# Altium PCB cm4gateway.PcbDoc (part 3 of 5)
Units mil, origin at the board's own origin, x right, y up, seen from the top; angles counter-clockwise.
Board outline 6299.21 x 4960.63 mil, 8 copper layers (Signal 1, Ground Plane 1, Signal 2, Power Plane 1, Power Plane 2, Signal 3, Ground Plane 2, Signal 4), stack 60.024 mil thick; 403 components, 273 nets, 1526 pads, 1156 vias.
Unrouted connection lines stored in the file: 5.
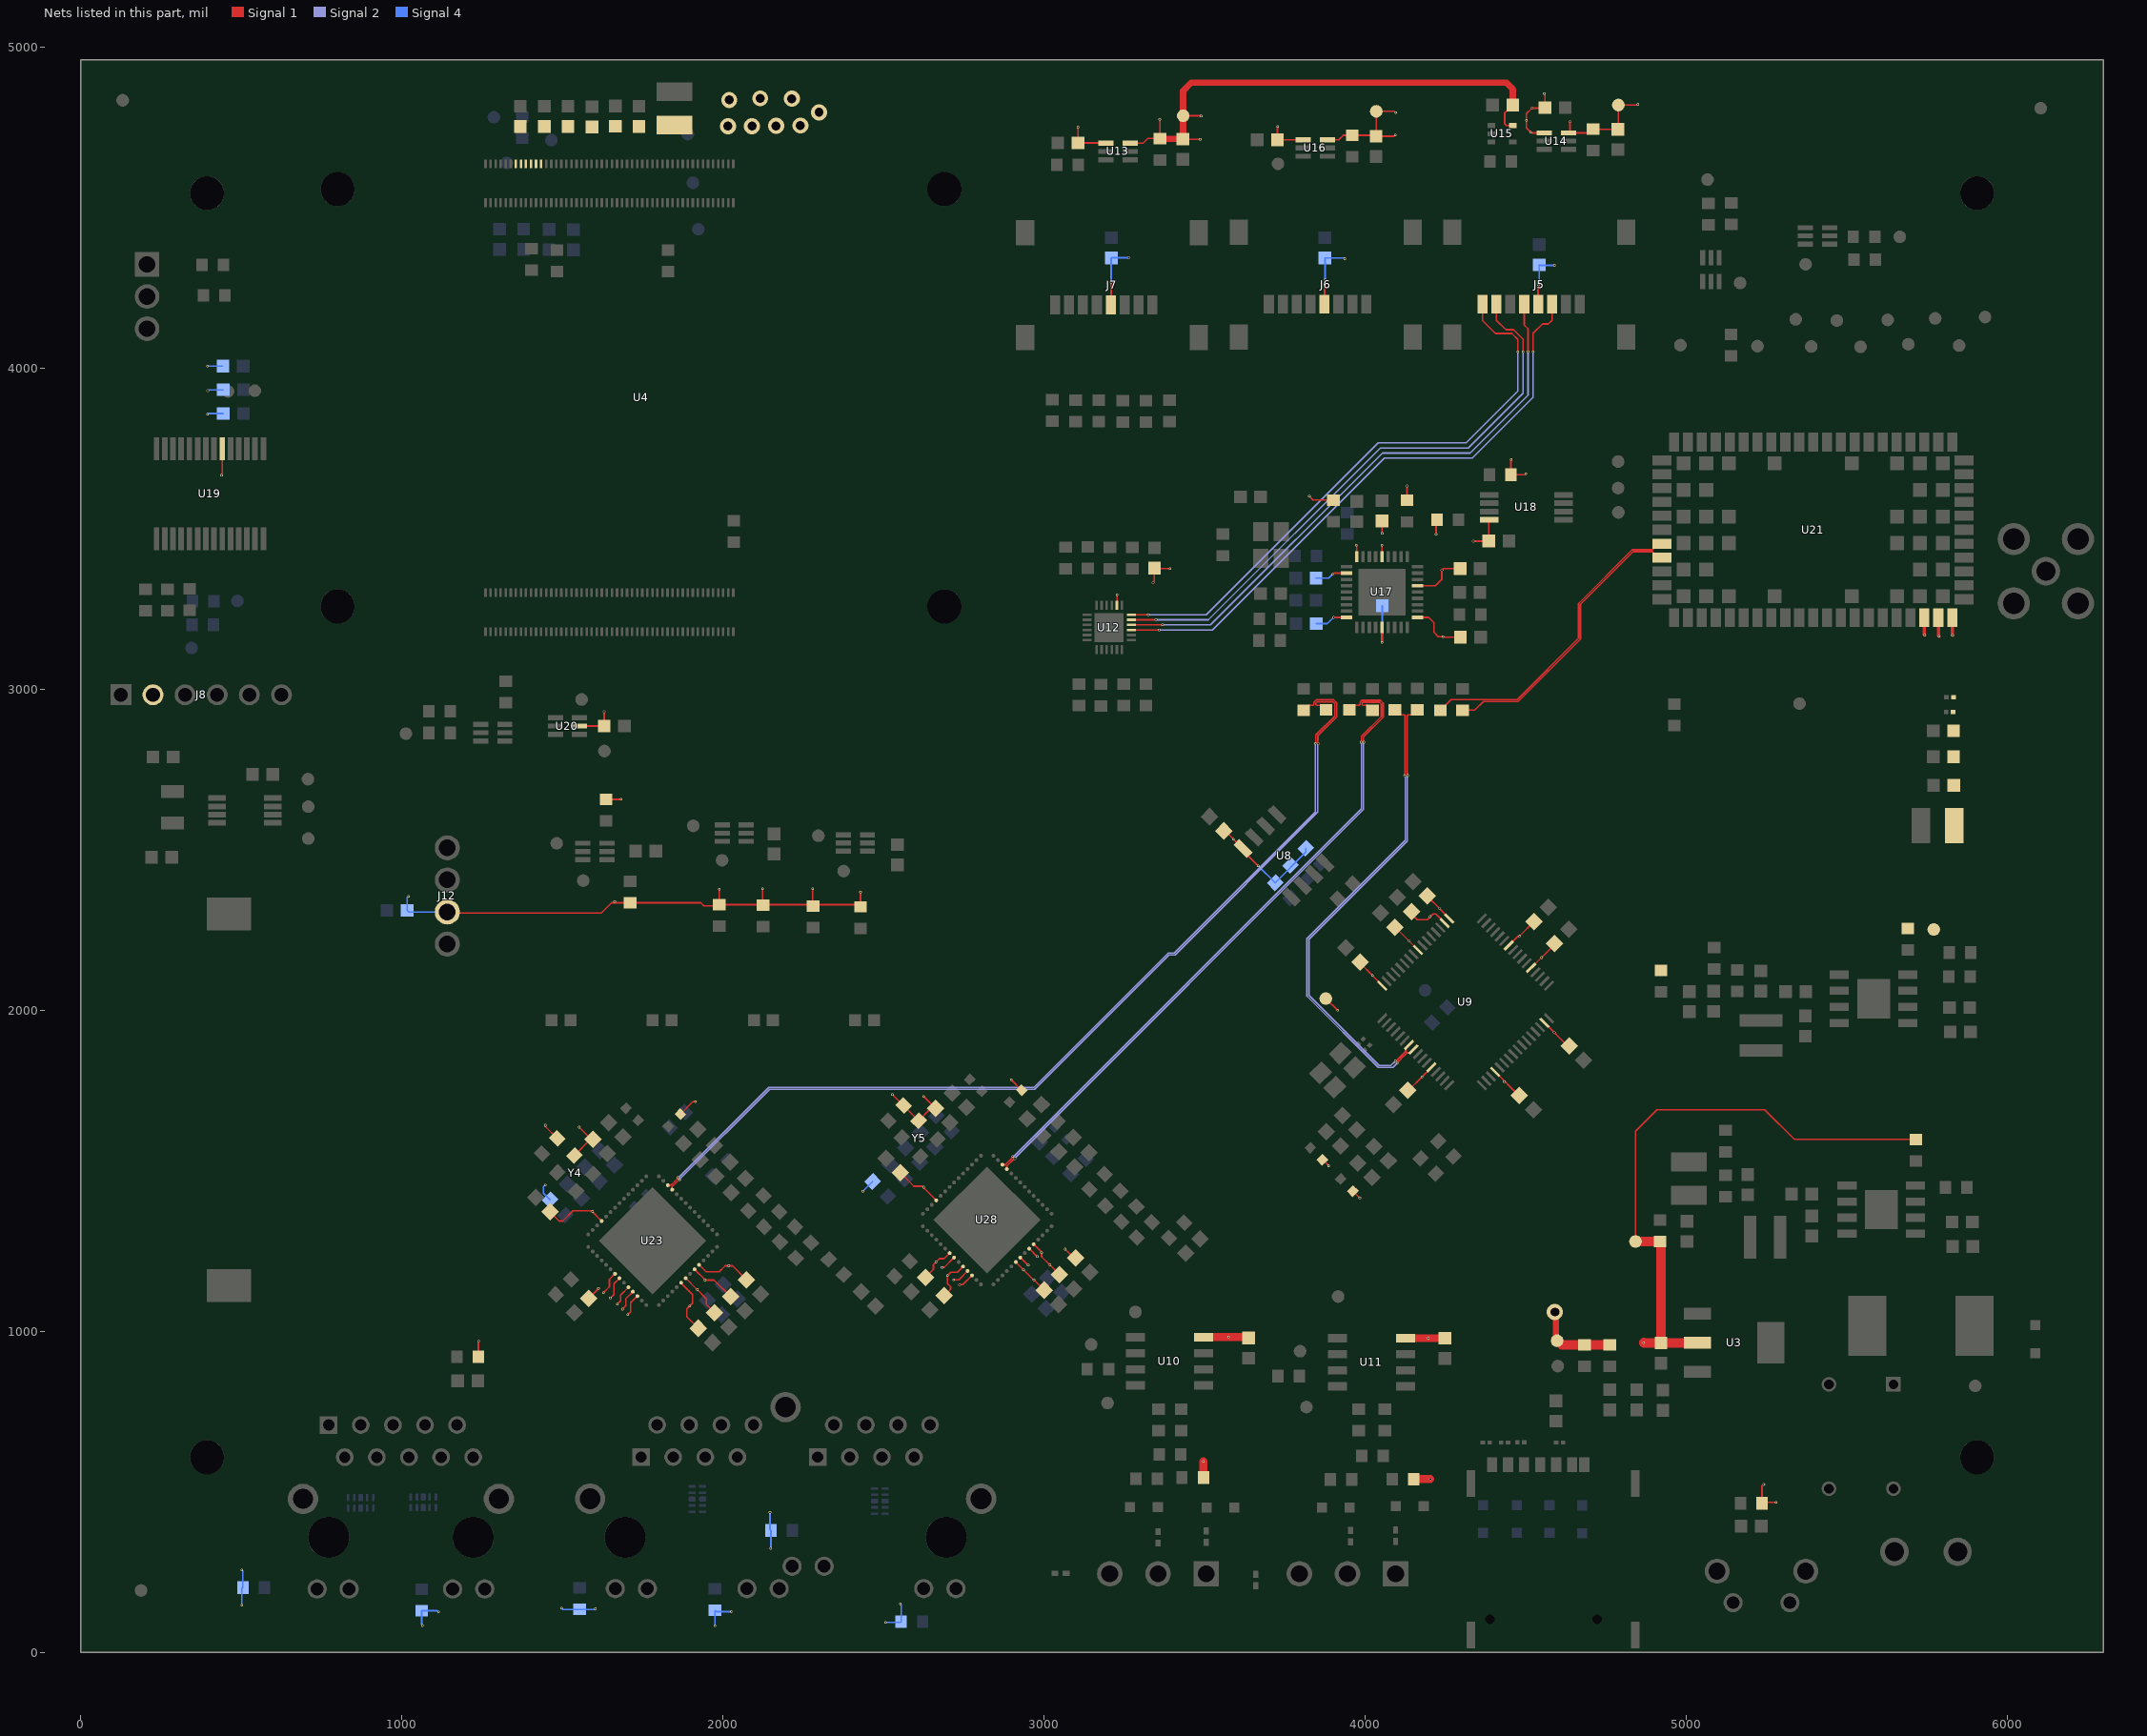
[diagram p8: the nets of this part, all layers, seen from the top]

## Via types
v1: diameter 8/8/8/8/8/8/8/8 (per signal layer), hole 5, Signal 1 to Signal 4, 822 vias
v2: diameter 8, hole 5, Signal 1 to Signal 4, tented both sides, 310 vias
v3: diameter 50, hole 28, Signal 1 to Signal 4, tented both sides, 10 vias
v4: diameter 8/8/8/8/8/8/8/8 (per signal layer), hole 5, Signal 1 to Signal 4, tented both sides, 9 vias
v5: diameter 8, hole 5, Signal 1 to Signal 4, 4 vias
v6: diameter 50, hole 5, Signal 1 to Signal 4, tented both sides, 1 vias

## Nets (pads, with @x,y where several pads share a name; then routed paths per layer and width w, separated by ;. In a path a pad name is that pad's centre, name@x,y a point inside that pad or via, vN(x,y) a via of type N, cw(c..) or ccw(c..) an arc to the next point about the centre after c; other vN are vias at no path point) (continued)
3v3: (continued)
  Signal 1 w5: v2(438.98,3666.34) 438.98,3667.15 440.94,3669.12 U19.20@440.94,3748.03 ; J12.2@1141.73,2305.71 1145.28,2302.17 1621.06,2302.17 1653.54,2334.65 v2@1665.08,2334.65 ; R127.2@1238.19,920.28 1238.19,966.71 1240.16,968.68 v2(1240.16,969.49) ; v2(1446.85,1641.73) 1447.42,1641.16 1447.42,1637.3 R118.2@1483.67,1601.05 ; C107.2@1461.98,1371.68 1490.16,1343.5 1500.98,1343.5 1532.48,1375 1590.56,1375 U23.25@1622.2,1343.36 ; Y4.4@1536.95,1547.44 1587.21,1597.69 1590.3,1597.69 v2(1552.16,1635.83) ; U20.5@1553.15,2884.84 C77.2@1629.91,2884.83 ; C108.2@1581.69,1101.63 1611.63,1131.57 1611.63,1133.28 v2(1612.2,1133.86) ; v2(1627.95,1120.08) 1646.65,1138.78 1646.65,1161.81 U23.35@1663.95,1179.11 ; C77.2@1629.91,2884.83 v2(1629.92,2929.13) ; R25.2@1635.83,2656.5 1681.27,2656.5 1682.26,2657.48 v2(1683.07,2657.48) ; v2(1649.61,1103.35) 1660.43,1114.17 1660.43,1147.75 U23.36@1677.87,1165.19 ; v2(1662.96,2338.02) 1662.96,2337.21 1665.08,2335.09 v2@1665.08,2334.65 ; v2(1671.26,1084.65) 1681.1,1094.49 1681.1,1112.74 U23.38@1705.71,1137.35 ; v2(1687.01,1068.9) 1697.83,1079.73 1697.83,1101.63 U23.39@1719.63,1123.43 ; v2(1703.64,1052.24) 1712.6,1061.21 1712.6,1088.56 U23.40@1733.55,1109.51 ; FB5.1@1867.58,1675.9 1906.25,1714.57 v2(1914.37,1714.57) ; U23.48@1869.96,1151.27 1869.96,1149.72 1905.51,1114.17 1905.51,1087.6 v2(1896.65,1078.74) 1887.79,1069.88 1887.79,1045.28 C109.2@1923.59,1009.48 ; U23.49@1883.88,1165.19 1884.35,1165.19 1919.7,1129.84 v2(1920.17,1129.84) 1948.82,1101.2 1948.82,1083.66 C110.2@1974.16,1058.32 ; U23.51@1911.72,1193.03 1943.32,1161.43 1943.32,1160.02 v2(1943.9,1159.45) 1972.44,1159.45 C111.2@2023.74,1108.15 ; U23.52@1925.64,1206.95 1947.55,1185.04 1988.19,1185.04 2006.89,1203.74 2029.53,1203.74 C112.2@2073.2,1160.07 ; v2(1988.19,2376.97) R96.1@1988.19,2328.74 ; v2(2123.03,2377.95) 2123.03,2330.71 R98.1@2125,2328.74 ; v2(2279.53,2377.95) R99.1@2279.53,2328.74 ; R99.1@2280.51,2323.82 2279.53,2324.81 R99.1@2279.53,2328.74 ; v2(2428.15,2368.11) R100.1@2428.15,2321.85 2421.26,2328.74 R99.1@2279.53,2328.74 ; v2(2527.56,1737.21) 2561.97,1702.8 R129.2@2563.03,1702.8 2563.03,1702.46 Y5.4@2609.42,1656.07 2647.25,1693.9 C116.2@2662.4,1693.9 v2(2625,1731.3) ; C127.2@2552.78,1493.48 2594.49,1451.77 2620.08,1451.77 U28.25@2664.15,1407.7 ; C128.2@2630.54,1167.94 2655.51,1192.92 2655.51,1207.68 2674.21,1226.38 2688.83,1226.38 U28.35@2705.91,1243.45 ; v2(2682.09,1198.82) 2682.66,1199.39 2689.69,1199.39 U28.36@2719.83,1229.53 ; C132.2@2688.98,1111.22 2708.66,1130.91 2708.66,1138.78 2698.82,1148.62 v2(2698.82,1173.23) 2709.65,1184.06 2730.03,1184.06 U28.38@2747.67,1201.7 ; v2(2718.5,1160.43) 2734.25,1160.43 U28.39@2761.59,1187.78 ; v2(2737.2,1144.69) 2737.78,1145.26 2746.91,1145.26 U28.40@2775.51,1173.86 ; v2(2897.64,1783.47) 2930.03,1751.07 FB8.1@2930.2,1751.07 ; U28.48@2911.92,1215.61 2911.92,1215.33 v2@2936.02,1191.23 ; U28.49@2925.84,1229.53 2926.4,1229.53 2950.07,1205.87 v2(2950.79,1205.87) ; v2(2935.86,1191.6) v2@2968.07,1159.4 ; U28.51@2953.68,1257.37 2954.05,1257.37 2978.23,1233.19 v2(2978.61,1233.19) ; U28.52@2967.6,1271.29 2991.55,1247.34 2991.55,1245.65 v2(2992.13,1245.08) 2992.13,1232.28 v2(3017.72,1206.69) C130.2@3047.61,1176.8 ; v2(2968.22,1160.41) 3000.43,1128.2 C129.2@3000.73,1128.2 ; v2(3065.94,1255.91) 3093.87,1227.98 C131.2@3098.79,1227.98 ; v2(3105.31,4750) C54.1@3105.31,4700.79 3191.93,4700.79 U13.1@3192.91,4699.8 ; U12.14@3226.38,3260.93 3226.92,3261.47 3226.92,3292.84 v2(3227.46,3293.39) ; v2(3339.57,3331.69) 3339.57,3332.51 3343.5,3336.44 C51.1@3343.5,3376.97 3345.47,3375 v2(3391.73,3375) ; C33.2@3559.93,2558.45 3563.83,2558.45 U8.8@3619.22,2503.06 3619.22,2496.93 v2(3666.34,2449.8) ; v2(3727.36,4751.97) 3727.36,4751.16 3726.38,4750.17 C60.1@3726.38,4710.63 U16.1@3807.09,4710.63 ; v2(3825.79,3600.39) 3837.6,3588.58 R83.1@3900.59,3588.58 ; FB2.1@3866.59,1534.05 3867.53,1534.05 v2(3885.83,1515.75) ; v2(3897.64,3357.28) 3898.45,3357.28 3902.39,3361.22 U17.29@3941.93,3361.22 ; v2(3901.57,3223.43) U17.36@3941.93,3223.43 ; FB1.1@3961.17,1436.73 3961.9,1436.73 v2(3983.27,1415.35) ; v2(3972.42,3448.12) 3972.42,3447.31 3973.42,3446.3 U17.27@3973.42,3412.4 ; v2(4052.16,3145.67) U17.5@4052.16,3191.93 ; U17.23@4052.18,3412.42 v2(4052.2,3447.81) ; C65.2@4052.16,3523.62 4052.16,3487.21 4053.25,3486.13 v2(4053.25,3485.32) ; C50.2@4091.9,2257.51 4094.41,2257.51 U9.56@4164.13,2187.79 ; R70.2@4129.92,3587.6 v2(4129.92,3632.87) ; C38.2@4143.7,2307.09 4143.7,2300.2 4162.4,2281.5 4192.91,2281.5 4210.63,2299.21 4219.74,2299.21 U9.50@4247.65,2271.3 ; U17.10@4162.4,3223.43 4196.85,3223.43 4213.58,3206.69 4213.58,3177.17 4227.36,3163.39 v2(4242.13,3163.39) 4242.94,3163.39 4244.91,3161.42 C63.2@4296.26,3161.42 ; U17.15@4162.4,3321.85 4218.5,3321.85 4238.19,3341.54 v2(4238.19,3370.08) 4239,3370.08 4243.92,3375 C64.2@4295.27,3375 ; v2(4220.47,3482.28) 4220.47,3524.61 R89.1@4223.42,3527.56 ; v2(4336.61,3460.63) 4383.86,3460.63 C73.2@4384.84,3461.61 4384.84,3526.1 U18.8@4386.3,3527.56 ; U9.20@4404.94,1807.79 4478.22,1734.5 C48.2@4480.06,1734.5 ; U9.42@4446.7,2201.71 4474.73,2229.74 4479.74,2229.74 v2(4480.31,2230.32) ; v2(4454.72,3714.57) 4454.72,3713.76 4453.74,3712.77 R90.1@4453.74,3667.32 4496.65,3667.32 4499.51,3670.18 v2(4500.32,3670.18) ; v2@4480.19,2230.44 C49.2@4525.34,2275.59 ; v2@4515.96,4735.02 v2@4518.7,4732.28 ; v2(4557.64,4854.46) 4557.64,4853.65 4560.04,4851.25 C57.1@4560.04,4811.02 4558.34,4809.33 v2(4518.86,4809.33) 4502.12,4792.59 v2(4502.12,4771.77) 4502.12,4747.58 v2(4515.32,4734.38) 4516.13,4734.38 4518.23,4732.28 U14.1@4558.07,4732.28 ; U9.31@4558.05,1960.9 4629.92,1889.03 C47.2@4635.58,1889.03 ; v2(5241.14,522.64) 5240.64,522.64 5235.24,517.24 R97.2@5235.24,464.57 5238.19,467.52 v2(5279.53,467.52) ; v2@1665.08,2334.65 1931.1,2334.65 1940.94,2324.8 1984.25,2324.8 R96.1@1988.19,2328.74 ; R96.1@1988.19,2328.74 R98.1@2125,2328.74 ; R98.1@2125,2328.74 R99.1@2279.53,2328.74
  Signal 1 w20: v3(4590.55,1060.04) 4594,1056.6 4594,973.92 TP68.1@4597.44,970.47
  Signal 1 w30: TP68.1@4597.44,970.47 4599.98,970.47 4612.77,957.68 R18.1@4683.07,957.68 R17.2@4761.81,957.68
  Signal 4 w5: v2(394.68,3856.3) 395.5,3856.3 397.46,3858.27 C74.2@443.9,3858.27 ; v2(394.68,4005.91) C76.2@442.91,4005.91 ; v2(395.67,3929.13) 396.48,3929.13 399.43,3932.09 C75.2@443.9,3932.09 ; v2(501.97,146.65) 501.97,198.82 R131.2@504.92,201.77 504.92,253.13 501.97,256.08 v2(501.97,256.89) ; v2(1020.67,2354.33) 1020.67,2353.52 1016.73,2349.58 C93.2@1016.73,2311.02 1022.05,2305.71 J12.2@1141.73,2305.71 ; v2(1063.98,83.66) 1063.98,84.47 1062.01,86.44 R130.2@1062.01,129.92 1109.42,129.92 1113.36,125.98 v2(1114.17,125.98) ; v2(1446.48,1455.71) 1440.94,1450.18 1440.94,1430.12 R112.2@1461.94,1409.12 ; v2(1497.05,137.8) 1497.86,137.8 1501.8,133.86 R113.2@1554.13,133.86 1599.58,133.86 1601.55,135.83 v2(1602.36,135.83) ; v2(1975.39,82.68) R114.2@1975.39,130.91 1979.33,126.97 v2(2026.57,126.97) ; v2(2146.65,436.02) 2146.65,382.88 R115.2@2149.61,379.92 2149.61,325.62 2148.62,324.63 v2(2148.62,323.82) ; v2(2436.02,1436.02) 2466.49,1466.5 R126.2@2466.49,1466.58 ; v2(2505.9,93.5) 2553.15,93.5 R116.2@2555.12,95.47 2555.12,147.81 2552.16,150.76 v2(2552.16,151.58) ; v2(3666.34,2449.8) 3719.44,2396.7 R32.2@3719.7,2396.7 3815.18,2492.17 R34.2@3815.18,2503.99 ; C66.2@3846.46,3345.47 3885.83,3345.47 v2(3897.64,3357.28) ; C67.2@3847.44,3203.74 3881.89,3203.74 v2(3901.57,3223.43) ; v2(4052.16,3145.67) 4052.16,3146.48 4053.15,3147.47 C62.2@4053.15,3259.84
  other v2: 2017.72,1203.74 2663.39,1215.55 1593.5,1373.03 2625,1448.82 4433.07,1777.56 4588.58,1931.1 4135.83,2215.55 4201.77,2291.34 3589.57,2532.48
3V3_SDA: C52.2 C58.1 J5.4 R67.1 TP27.1 U14.6 | length 505.4
  Signal 1 w5: J5.4@4538.39,4198.82 4538.39,4258.05 4539.37,4259.03 v2(4539.37,4259.84) ; v2(4637.79,4767.72) 4637.79,4737.2 U14.6@4632.87,4732.28 4699.81,4732.28 4710.63,4743.11 C58.1@4786.42,4743.11 4788.39,4745.08 TP27.1@4788.39,4818.9 4846.63,4818.9 4848.6,4820.87 v2(4849.41,4820.87)
  Signal 4 w5: v2(4539.37,4259.84) 4539.37,4260.65 4542.1,4263.39 C52.2@4542.1,4320.87 4543.08,4319.88 v2(4589.57,4319.88)
3V3_SDB: C53.2 C61.1 J6.4 R69.1 TP29.1 U16.6 | length 568.9
  Signal 1 w5: J6.4@3873.23,4198.82 3873.23,4271.8 3874.91,4273.49 v2(3874.91,4274.3) ; U16.6@3881.89,4710.63 3917.32,4710.63 3931.1,4724.41 R69.1@3959.64,4724.41 4030.51,4724.41 C61.1@4033.46,4721.46 ; v2(4093.52,4725.16) 4092.71,4725.16 4089,4721.46 C61.1@4033.46,4721.46 ; v2(4094.91,4795.43) 4094.1,4795.43 4090.31,4799.21 TP29.1@4034.45,4799.21 4034.45,4722.44 C61.1@4033.46,4721.46
  Signal 4 w5: v2(3874.91,4274.3) 3874.91,4341.62 C53.2@3874.02,4342.52 3933.83,4342.52 3936.11,4340.24 v2(3936.92,4340.24)
3V3_SDD: C55.1 C56.2 C59.1 J7.4 R59.1 TP26.1 U13.6 U15.5 | length 1893.7
  Signal 1 w5: J7.4@3207.68,4196.85 3208.53,4197.7 v2(3208.53,4267.35) ; U13.6@3267.72,4699.8 3308.07,4699.8 3322.83,4714.57 R59.1@3361.22,4714.57 3361.22,4772.31 3360.1,4773.43 v2(3360.1,4774.24) ; C55.1@3433.07,4713.58 C55.1@3432.09,4712.6 3432.73,4711.95 v2(3486.26,4711.95) ; TP26.1@3433.07,4785.43 3488.67,4785.43 v2(3489.04,4785.07) ; U15.5@4459.65,4754.92 4439.96,4754.92 4434.05,4760.83 4434.05,4793.31 C59.1@4459.65,4818.9
  Signal 1 w20: R59.1@3353.35,4714.57 3354.33,4713.58 3431.1,4713.58 C55.1@3432.09,4712.6 ; C55.1@3433.07,4713.58 3432.58,4714.08 3432.58,4784.94 TP26.1@3433.07,4785.43 3433.07,4863.19 3458.66,4888.78 4438.98,4888.78 4459.65,4868.11 C59.1@4459.65,4818.9
  Signal 4 w5: v2(3208.53,4267.35) 3208.53,4341.4 C56.2@3209.65,4342.52 3210.27,4343.14 v2(3263.64,4343.14)
3v8: C79.2 C80.1 C81.2 C82.2 C83.2 C84.2 R2.2 R8.1 TP65.1 U21.51 U21.52 U21.53 | length 163.6
  Signal 1 w10: U21.51@5741.14,3222.44 5741.14,3169.29 v2(5742.13,3168.31) ; U21.52@5785.43,3218.51 5785.43,3165.35 v2(5786.42,3164.37) ; U21.53@5827.76,3221.46 5827.76,3168.31 v2(5828.74,3167.32)
5V: C15.2 C26.2 C27.2 C28.2 C29.2 C30.2 C31.2 C32.2 C40.2 C43.2 R10.2 R15.1 R36.2 R45.2 TP67.1 U3.2 U4.77 U4.79 U4.81 U4.83 U4.85 U4.87 U10.8 U11.8 | length 2210.2
  Signal 1 w5: TP67.1@4841.53,1279.53 4841.53,1623.03 4908.46,1689.96 5244.09,1689.96 5336.61,1597.44 R15.1@5714.57,1597.44
  Signal 1 w25: R36.2@3496.06,544.29 v2(3496.06,594.49) ; U10.8@3497.05,981.5 3574.01,981.5 v2(3574.8,982.28) 3633.86,982.28 C40.2@3636.81,979.33 ; U11.8@4125.98,978.54 4126.18,978.35 v2(4195.87,978.35) C43.2@4248.03,978.35 ; R45.2@4150.59,539.37 v2(4202.76,539.37)
  Signal 1 w30: TP67.1@4841.53,1279.53 R10.2@4918.31,1279.53 4918.54,1279.53 4921.26,1276.81 C15.2@4921.26,963.58 ; v2(4867.13,964.57) 4867.62,964.08 5033.96,964.08 U3.2@5034.45,964.57
  other v3: 2015.75,4752.95 2090.55,4752.95 2165.35,4753.94 2241.14,4754.92 2299.21,4796.26 2019.68,4834.65 2214.57,4838.58 2116.14,4839.57
_D1_N: R75.1 U23.11 | length 2994.9
  Signal 1 w5: U23.11@1842.12,1440.8 1841.76,1441.16 1841.76,1450.11 1852.11,1460.46 1862.99,1471.34 1865.11,1471.34 v2(1865.69,1471.91) ; R75.1@3808.07,2934.06 3823.29,2949.27 3836.88,2949.27 3839.81,2952.2 3839.81,2958.83 3847.24,2966.26 3901.76,2966.26 3911.14,2956.88 3911.14,2913.2 3852.46,2854.52 3852.46,2840.34 3852.15,2840.03 3852.15,2832.35 3854.23,2830.27 v2(3854.23,2830)
  Signal 2 w5: v2(1865.69,1471.91) 1866.26,1472.49 1866.26,1474.61 2145.59,1753.94 2971.08,1753.94 3389.51,2172.36 3407.99,2172.36 3852.28,2616.66 3852.28,2827.24 3854.23,2829.18 v2(3854.23,2830)
_D1_P: R74.1 U23.12 | length 2968.3
  Signal 1 w5: U23.12@1828.2,1454.71 1828.56,1454.36 1837.52,1454.36 1849.62,1466.46 1858.75,1475.58 1858.75,1477.7 v2(1859.32,1478.28) ; v2(3844.34,2830.34) 3844.34,2831.15 3846.15,2832.96 3846.15,2842.52 3846.46,2842.83 3846.46,2857 3905.14,2915.68 3905.14,2954.4 3899.28,2960.26 3849.72,2960.26 3845.81,2956.34 3845.81,2952.2 3848.74,2949.27 3863.72,2949.27 R74.1@3877.95,2935.04
  Signal 2 w5: v2(1859.32,1478.28) 1859.9,1478.85 1862.02,1478.85 2143.1,1759.94 2968.6,1759.94 3387.02,2178.36 3405.5,2178.36 3844.34,2617.2 v2(3844.34,2830.34)
_D2_N: R80.1 U28.11 | length 2064.2
  Signal 1 w5: U28.11@2884.08,1505.14 2883.72,1505.5 2883.72,1514.46 2906.42,1537.16 2908.54,1537.16 v2(2909.12,1537.73) ; R80.1@3950.79,2935.04 3965.02,2949.27 3980.99,2949.27 3983.92,2952.2 3983.92,2958.83 3990.36,2965.27 4046.45,2965.27 4055.82,2955.9 4055.82,2912.21 3994.7,2851.09 3994.7,2836.96 3996.2,2835.46 v2(3996.2,2834.65)
  Signal 2 w5: v2(2909.12,1537.73) 2909.69,1538.31 2909.69,1540.43 3994.7,2625.44 3994.7,2832.33 3996.2,2833.83 v2(3996.2,2834.65)
_D2_P: R78.1 U28.12 | length 2039.4
  Signal 1 w5: U28.12@2870.16,1519.06 2870.52,1518.7 2879.48,1518.7 2902.18,1541.4 2902.18,1543.52 v2(2902.75,1544.1) ; v2(3987.2,2834.65) 3987.2,2835.46 3988.7,2836.96 3988.7,2853.58 4049.82,2914.7 4049.82,2953.41 4043.97,2959.27 3992.84,2959.27 3989.92,2956.34 3989.92,2952.2 3992.84,2949.27 4007.42,2949.27 R78.1@4022.64,2934.06
  Signal 2 w5: v2(2902.75,1544.1) 2903.33,1544.67 2905.45,1544.67 3988.7,2627.92 3988.7,2832.33 3987.2,2833.83 v2(3987.2,2834.65)
_D3_N: R84.1 U9.8 | length 1560.3
  Signal 1 w4: v2(4099.79,1835.25) 4100.55,1836.02 4100.55,1838.85 4119.56,1857.85 4120.3,1857.85 4130.86,1868.42 4134.17,1868.42 4136.06,1866.53 4139.35,1866.53 U9.8@4150.21,1877.39
  Signal 1 w5: R84.1@4092.52,2935.04 4107.74,2919.82 4121.53,2919.82 4124.46,2916.89 4124.46,2738.52 4123.53,2737.59 4123.53,2730.89 v2(4122.96,2730.32) ; v2(4099.79,1835.25) 4100.36,1835.83 4100.36,1837.95 4121.07,1858.66 4121.81,1858.66 4131.15,1868 4135.29,1868 4136.77,1866.53 4139.35,1866.53 U9.8@4150.21,1877.39
  Signal 2 w5: v2(4099.79,1835.25) 4095.16,1830.62 4086.52,1821.99 4040.59,1821.99 3818.8,2043.78 3818.8,2223.33 3819.3,2223.83 4124.63,2529.15 4124.63,2727.84 4122.96,2729.5 v2(4122.96,2730.32)
_D3_P: R82.1 U9.7 | length 1544.3
  Signal 1 w4: v2(4093.42,1841.62) 4094.19,1842.38 4097.02,1842.38 4117.49,1862.85 4118.22,1862.85 4127.32,1871.95 4127.32,1875.26 4125.44,1877.15 4125.44,1880.45 U9.7@4136.29,1891.3
  Signal 1 w5: v2(4093.42,1841.62) 4094,1842.19 4096.12,1842.19 4118.58,1864.66 4119.32,1864.66 4126.91,1872.24 4126.91,1876.39 4125.44,1877.86 4125.44,1880.45 U9.7@4136.29,1891.3 ; v2(4132.29,2730.53) 4131.72,2731.1 4131.72,2733.22 4131.39,2733.55 4131.39,2738.25 4130.46,2739.17 4130.46,2916.89 4133.39,2919.82 4147.18,2919.82 R82.1@4162.4,2935.04
  Signal 2 w5: v2(4093.42,1841.62) 4079.8,1827.99 4043.07,1827.99 3824.8,2046.26 3824.8,2220.85 4130.63,2526.67 4130.63,2728.05 4132.29,2729.71 v2(4132.29,2730.53)
_D4_N: R87.1 U21.28 | length 970.6
  Signal 1 w5: R87.1@4234.25,2934.06 4236.22,2934.06 4251.44,2949.27 4251.44,2951.24 4267.72,2967.52 4473.33,2967.52 4664.28,3158.47 4664.28,3266.27 4832.11,3434.1 4894.26,3434.1 4897.18,3437.03 4897.18,3439.51 4910.43,3452.76 U21.28@4924.21,3452.76
_D4_P: R86.1 U21.29 | length 898
  Signal 1 w5: R86.1@4303.15,2934.06 4303.45,2934.36 4340.85,2934.36 4368.02,2961.52 4475.82,2961.52 4670.28,3155.98 4670.28,3263.78 4834.6,3428.1 4894.26,3428.1 4897.18,3425.17 4897.18,3422.7 4910.43,3409.45 U21.29@4924.21,3409.45
ACLK: J5.5 U12.10 | length 1820
  Signal 1 w5: U12.10@3271.76,3199.8 v2(3368.9,3199.8) ; J5.5@4495.08,4198.82 4495.08,4133.86 4506.89,4122.05 v2(4506.89,4050.2)
  Signal 2 w5: v2(3368.9,3199.8) 3517.97,3199.8 4053.4,3735.24 4327.02,3735.24 4506.89,3915.1 v2(4506.89,4050.2)
ACMD: J5.3 U12.9 | length 1876.3
  Signal 1 w5: U12.9@3271.76,3184.06 v2(3358.9,3184.06) ; v2(4522.64,4050.2) 4522.64,4107.74 4552.16,4137.27 4570.33,4137.27 4581.69,4148.62 J5.3@4581.69,4198.82
  Signal 2 w5: v2(3358.9,3184.06) 3524.49,3184.06 4059.92,3719.49 4333.54,3719.49 4522.64,3908.58 v2(4522.64,4050.2)
ADAT0: J5.7 U12.11 | length 1837.1
  Signal 1 w5: U12.11@3271.76,3215.55 v2(3348.42,3215.55) ; J5.7@4408.46,4198.82 4408.46,4148.62 4437.99,4119.1 4461.61,4119.1 4491.14,4089.57 v2(4491.14,4050.2)
  Signal 2 w5: v2(3348.42,3215.55) 3511.44,3215.55 4046.88,3750.98 4320.5,3750.98 4491.14,3921.63 v2(4491.14,4050.2)
ADAT1: J5.8 U12.12 | length 1838.6
  Signal 1 w5: U12.12@3271.76,3231.3 v2(3324.43,3231.3) ; J5.8@4365.16,4198.82 4365.16,4147.64 4405.51,4107.28 4456.69,4107.28 4475.39,4088.58 v2(4475.39,4050.2)
  Signal 2 w5: v2(3324.43,3231.3) 3504.92,3231.3 4040.35,3766.73 4313.98,3766.73 4475.39,3928.15 v2(4475.39,4050.2)

## Text inside footprints (layer, text, board x,y; h text height)
C1: Mechanical 15 "+" at 5340.95,1970.49 h59.06 r270
C2: Mechanical 15 "+" at 5202.17,2110.26 h59.06 r270
C3: Mechanical 15 "+" at 5114.94,2007.97 h59.06 r90
C4: Mechanical 15 "+" at 5039.15,2006.98 h59.06 r90
C5: Mechanical 15 "+" at 5872.59,1961.86 h59.06 r180
C6: Mechanical 15 "+" at 5870.62,2037.64 h59.06 r180
C7: Mechanical 15 "+" at 5320.5,2028.42 h59.06
C8: Mechanical 15 "+" at 5361.04,1347.4 h59.06 r270
C9: Mechanical 15 "+" at 5161.23,1476.34 h59.06 r270
C11: Mechanical 15 "+" at 5031.68,1291.37 h59.06 r90
C12: Mechanical 15 "+" at 5879.88,1293.49 h59.06 r180
C13: Mechanical 15 "+" at 5878.9,1370.26 h59.06 r180
C14: Mechanical 15 "+" at 5339.6,1397.45 h59.06
C15: Mechanical 15 "+" at 4950.97,912.44 h59.06 r90
C16: Mechanical 15 "+" at 4956.88,765.78 h59.06 r90
C17: Mechanical 15 "+" at 4875.18,766.77 h59.06 r90
C18: Mechanical 15 "+" at 4791.52,766.77 h59.06 r90
C19: Mechanical 15 "+" at 2189.16,2498.07 h59.06 r90
C20: Mechanical 15 "+" at 2573.37,2464.42 h59.06 r90
C21: Mechanical 15 "+" at 1779.49,2524.79 h59.06 r180
C22: Mechanical 15 "+" at 1429.43,4380.12 h59.06 r270
C23: Mechanical 15 "+" at 1504.96,4379.96 h59.06 r270
C24: Mechanical 15 "+" at 1274.64,4380.94 h59.06 r270
C25: Mechanical 15 "+" at 1349.45,4380.94 h59.06 r270
C27: Mechanical 15 "+" at 1708.48,4803.11 h59.06 r270
C28: Mechanical 15 "+" at 1635.64,4804.1 h59.06 r270
C29: Mechanical 15 "+" at 1562.81,4802.13 h59.06 r270
C30: Mechanical 15 "+" at 1488,4803.11 h59.06 r270
C31: Mechanical 15 "+" at 1414.19,4803.11 h59.06 r270
C32: Mechanical 15 "+" at 1339.38,4803.11 h59.06 r270
C33: Mechanical 15 "+" at 3502.76,2573.6 h59.06 r315
C34: Mechanical 15 "+" at 4033.3,1508.98 h59.06 r135
C35: Mechanical 15 "+" at 3935.86,1606.16 h59.06 r135
C36: Mechanical 15 "+" at 4084.85,1560.78 h59.06 r135
C37: Mechanical 15 "+" at 3986.06,1656.36 h59.06 r135
C38: Mechanical 15 "+" at 4086.53,2322.24 h59.06 r315
C39: Mechanical 15 "+" at 4135.74,2370.87 h59.06 r315
C40: Mechanical 15 "+" at 3666.52,928.19 h59.06 r90
C43: Mechanical 15 "+" at 4277.74,927.2 h59.06 r90
C44: Mechanical 15 "+" at 4117.72,1694.06 h59.06 r45
C45: Mechanical 15 "+" at 4604.47,2264.85 h59.06 r225
C46: Mechanical 15 "+" at 3927.44,2165.38 h59.06 r315
C47: Mechanical 15 "+" at 4692.75,1873.87 h59.06 r135
C48: Mechanical 15 "+" at 4537.24,1719.35 h59.06 r135
C49: Mechanical 15 "+" at 4540.5,2332.76 h59.06 r225
C50: Mechanical 15 "+" at 4034.73,2272.66 h59.06 r315
C51: Mechanical 15 "+" at 3373.22,3388.82 h59.06 r90
C52: Mechanical 15 "+" at 4571.81,4372.01 h59.06 r90
C53: Mechanical 15 "+" at 3903.73,4393.66 h59.06 r90
C54: Mechanical 15 "+" at 3093.47,4730.5 h59.06 r180
C55: Mechanical 15 "+" at 3402.37,4700.75 h59.06 r270
C56: Mechanical 15 "+" at 3239.36,4393.66 h59.06 r90
C57: Mechanical 15 "+" at 4571.89,4781.31 h59.06
C58: Mechanical 15 "+" at 4756.71,4731.26 h59.06 r270
C59: Mechanical 15 "+" at 4447.8,4848.61 h59.06 r180
C60: Mechanical 15 "+" at 3714.53,4740.34 h59.06 r180
C61: Mechanical 15 "+" at 4003.75,4709.61 h59.06 r270
C62: Mechanical 15 "+" at 4082.86,3310.99 h59.06 r90
C63: Mechanical 15 "+" at 4347.4,3191.13 h59.06 r180
C64: Mechanical 15 "+" at 4346.42,3404.71 h59.06 r180
C65: Mechanical 15 "+" at 4022.45,3574.77 h59.06 r270
C66: Mechanical 15 "+" at 3795.31,3375.18 h59.06 r180
C67: Mechanical 15 "+" at 3796.3,3233.45 h59.06 r180
C68: Mechanical 15 "+" at 3943.71,3572.8 h59.06 r270
C69: Mechanical 15 "+" at 3686.06,3267.53 h59.06
C70: Mechanical 15 "+" at 3623.06,3568.71 h59.06
C71: Mechanical 15 "+" at 3795.31,3306.29 h59.06 r180
C72: Mechanical 15 "+" at 4345.44,3330.89 h59.06 r180
C73: Mechanical 15 "+" at 4435.99,3491.33 h59.06 r180
C74: Mechanical 15 "+" at 495.04,3828.56 h59.06
C75: Mechanical 15 "+" at 495.04,3902.37 h59.06
C76: Mechanical 15 "+" at 494.06,3976.19 h59.06
C77: Mechanical 15 "+" at 1681.05,2914.55 h59.06 r180
C78: Mechanical 15 "+" at 5221.42,422.43 h59.06 r180
C80: Mechanical 15 "+" at 5820.83,2729.52 h59.06 r180
C81: Mechanical 15 "+" at 5780.55,2759.66 h59.06
C83: Mechanical 15 "+" at 5780.55,2840.37 h59.06
C85: Mechanical 15 "+" at 4623.22,732.32 h59.06 r90
C90: Mechanical 15 "+" at 237.24,2758.67 h59.06
C91: Mechanical 15 "+" at 232.32,2446.67 h59.06
C92: Mechanical 15 "+" at 547.28,2704.54 h59.06
C93: Mechanical 15 "+" at 965.59,2340.74 h59.06 r180
C94: Mechanical 15 "+" at 2488.03,1108.13 h59.06 r135
C95: Mechanical 15 "+" at 1544.88,1471.54 h59.06 r135
C96: Mechanical 15 "+" at 1652.4,1582.54 h59.06 r135
C97: Mechanical 15 "+" at 1892.49,1641.45 h59.06 r225
C98: Mechanical 15 "+" at 1944.66,1591.26 h59.06 r225
C99: Mechanical 15 "+" at 1992.88,1539.09 h59.06 r225
C100: Mechanical 15 "+" at 2040.5,1488.28 h59.06 r225
C101: Mechanical 15 "+" at 1647.61,1574.52 h59.06 r135
C102: Mechanical 15 "+" at 1600,1523.71 h59.06 r135
C103: Mechanical 15 "+" at 1966.68,1038.77 h59.06 r315
C104: Mechanical 15 "+" at 2015.89,1087.76 h59.06 r315
C105: Mechanical 15 "+" at 1824.58,1322.38 h59.06 r315
C106: Mechanical 15 "+" at 1631.18,1620.1 h59.06 r315
C107: Mechanical 15 "+" at 1404.81,1386.84 h59.06 r315
C108: Mechanical 15 "+" at 1566.54,1044.45 h59.06 r45
C109: Mechanical 15 "+" at 1980.77,994.32 h59.06 r135
C110: Mechanical 15 "+" at 2031.33,1043.17 h59.06 r135
C111: Mechanical 15 "+" at 2080.91,1093 h59.06 r135
C112: Mechanical 15 "+" at 2130.38,1144.91 h59.06 r135
C113: Mechanical 15 "+" at 3470.7,1230.84 h59.06 r45
C114: Mechanical 15 "+" at 2549.81,1531.58 h59.06 r135
C115: Mechanical 15 "+" at 1225.36,875.18 h59.06 r180
C116: Mechanical 15 "+" at 2719.58,1678.74 h59.06 r135
C117: Mechanical 15 "+" at 2962.74,1718.34 h59.06 r225
C118: Mechanical 15 "+" at 3010.6,1666.79 h59.06 r225
C119: Mechanical 15 "+" at 3060.8,1616.6 h59.06 r225
C120: Mechanical 15 "+" at 3110.99,1568.37 h59.06 r225
C121: Mechanical 15 "+" at 2644.73,1631.36 h59.06 r135
C122: Mechanical 15 "+" at 3025.98,1108.18 h59.06 r315
C123: Mechanical 15 "+" at 2596.12,1581.64 h59.06 r135
C124: Mechanical 15 "+" at 2977.57,1058.35 h59.06 r315
C125: Mechanical 15 "+" at 3000.76,1531.26 h59.06 r315
C126: Mechanical 15 "+" at 2701.32,1712.37 h59.06 r315
C127: Mechanical 15 "+" at 2495.61,1508.63 h59.06 r315
C128: Mechanical 15 "+" at 2615.38,1110.77 h59.06 r45
C129: Mechanical 15 "+" at 3057.91,1113.05 h59.06 r135
C130: Mechanical 15 "+" at 3104.79,1161.64 h59.06 r135
C131: Mechanical 15 "+" at 3155.97,1212.82 h59.06 r135
C132: Mechanical 15 "+" at 2673.82,1054.05 h59.06 r45
J5: Mechanical 15 "+" at 4561.81,4287.4 h59.06 r180
J6: Mechanical 15 "+" at 3896.65,4287.4 h59.06 r180
J7: Mechanical 15 "+" at 3231.1,4285.43 h59.06 r180
J13: B.Adhes "+" at 2175.09,322.8 h59.06
J14: Mechanical 15 "+" at 977.62,421.17 h59.06
L1: Mechanical 15 "+" at 5262.78,1901.69 h59.06 r90
L2: Mechanical 15 "+" at 5264.7,1323.23 h59.06 r180
R1: Mechanical 15 "+" at 1353.72,2971.17 h59.06 r90
R2: Mechanical 15 "+" at 4951.16,2070.58 h59.06 r90
R4: Mechanical 15 "+" at 5831,2074.49 h59.06
R5: Mechanical 15 "+" at 5187.96,2071.63 h59.06 r90
R7: Mechanical 15 "+" at 5871.93,2209.09 h59.06 r180
R8: Mechanical 15 "+" at 5659.66,2240.5 h59.06 r270
R9: Mechanical 15 "+" at 5056.31,2181.44 h59.06 r270
R10: Mechanical 15 "+" at 4888.41,1332.96 h59.06 r270
R11: Mechanical 15 "+" at 5820.58,1417.94 h59.06
R13: Mechanical 15 "+" at 5151.94,1432.79 h59.06 r90
R15: Mechanical 15 "+" at 5684.67,1583.95 h59.06 r270
R16: Mechanical 15 "+" at 5092.15,1612.49 h59.06 r270
R17: Mechanical 15 "+" at 4791.71,904.24 h59.06 r90
R18: Mechanical 15 "+" at 4653.17,944.18 h59.06 r270
R19: Mechanical 15 "+" at 391.45,4290.97 h59.06
R20: Mechanical 15 "+" at 395.39,4196.48 h59.06
R21: Mechanical 15 "+" at 2003.57,3511.11 h59.06 r270
R23: Mechanical 15 "+" at 359.95,3229.7 h59.06 r180
R24: Mechanical 15 "+" at 401.86,3243.72 h59.06
R25: Mechanical 15 "+" at 1665.72,2603.06 h59.06 r90
R26: Mechanical 15 "+" at 1680.73,2388.08 h59.06 r270
R27: Mechanical 15 "+" at 1404.9,4768.98 h59.06 r90
R28: Mechanical 15 "+" at 1858.64,4313.69 h59.06 r90
R29: Mechanical 15 "+" at 1433.44,4318.61 h59.06 r90
R30: Mechanical 15 "+" at 1513.17,4313.69 h59.06 r90
R32: Mechanical 15 "+" at 3736.35,2337.78 h59.06 r315
R33: Mechanical 15 "+" at 3784.53,2391.95 h59.06 r315
R34: Mechanical 15 "+" at 3831.82,2445.06 h59.06 r315
R35: Mechanical 15 "+" at 3945.27,2334.83 h59.06 r45
R36: Mechanical 15 "+" at 3442.63,514.39 h59.06
R37: Mechanical 15 "+" at 3397.27,743.39 h59.06 r270
R38: Mechanical 15 "+" at 3371.76,586.24 h59.06
R39: Mechanical 15 "+" at 3326.4,744.38 h59.06 r270
R40: Mechanical 15 "+" at 3147.35,851.99 h59.06
R41: Mechanical 15 "+" at 3298.93,510.46 h59.06
R42: Mechanical 15 "+" at 4266.56,1978.22 h59.06 r45
R43: Mechanical 15 "+" at 4231.49,1521.42 h59.06 r135
R44: Mechanical 15 "+" at 4216.09,1561.51 h59.06 r315
R45: Mechanical 15 "+" at 4097.16,509.47 h59.06
R46: Mechanical 15 "+" at 4031.13,743.39 h59.06 r270
R47: Mechanical 15 "+" at 4002.67,582.31 h59.06
R48: Mechanical 15 "+" at 3949.43,744.38 h59.06 r270
R49: Mechanical 15 "+" at 3741.84,830.34 h59.06
R50: Mechanical 15 "+" at 3905.23,508.49 h59.06
R51: Mechanical 15 "+" at 3037.03,3428.43 h59.06 r270
R52: Mechanical 15 "+" at 3138.17,2962.31 h59.06 r90
R53: Mechanical 15 "+" at 3105.93,3429.42 h59.06 r270
R54: Mechanical 15 "+" at 3174.83,3427.45 h59.06 r270
R55: Mechanical 15 "+" at 3207.06,2961.33 h59.06 r90
R56: Mechanical 15 "+" at 3277.93,2962.31 h59.06 r90
R57: Mechanical 15 "+" at 3346.83,2962.31 h59.06 r90
R58: Mechanical 15 "+" at 3244.71,3427.45 h59.06 r270
R59: Mechanical 15 "+" at 3331.32,4701.07 h59.06 r270
R60: Mechanical 15 "+" at 3052.87,4602.98 h59.06
R61: Mechanical 15 "+" at 3128.32,3846.17 h59.06 r90
R62: Mechanical 15 "+" at 3055.49,3848.14 h59.06 r90
R63: Mechanical 15 "+" at 3420.65,3846.17 h59.06 r90
R64: Mechanical 15 "+" at 3346.83,3845.19 h59.06 r90
R65: Mechanical 15 "+" at 3274.98,3845.19 h59.06 r90
R66: Mechanical 15 "+" at 3200.17,3846.17 h59.06 r90
R67: Mechanical 15 "+" at 4679.75,4730.6 h59.06 r270
R68: Mechanical 15 "+" at 4402.28,4612.82 h59.06
R69: Mechanical 15 "+" at 3929.75,4710.91 h59.06 r270
R70: Mechanical 15 "+" at 4159.82,3534.17 h59.06 r90
R74: Mechanical 15 "+" at 3907.85,2948.54 h59.06 r90
R75: Mechanical 15 "+" at 3837.97,2947.55 h59.06 r90
R76: Mechanical 15 "+" at 3723.71,3248.4 h59.06 r180
R77: Mechanical 15 "+" at 3721.74,3181.47 h59.06 r180
R78: Mechanical 15 "+" at 4052.54,2947.55 h59.06 r90
R79: Mechanical 15 "+" at 4306.8,3202.39 h59.06
R80: Mechanical 15 "+" at 3980.68,2948.54 h59.06 r90
R81: Mechanical 15 "+" at 3914,3495.78 h59.06 r270
R82: Mechanical 15 "+" at 4192.3,2948.54 h59.06 r90
R83: Mechanical 15 "+" at 3870.69,3575.09 h59.06 r270
R84: Mechanical 15 "+" at 4122.42,2948.54 h59.06 r90
R85: Mechanical 15 "+" at 3527.18,3468.79 h59.06 r270
R86: Mechanical 15 "+" at 4333.05,2947.55 h59.06 r90
R87: Mechanical 15 "+" at 4264.15,2947.55 h59.06 r90
R88: Mechanical 15 "+" at 3834.93,3384.47 h59.06
R89: Mechanical 15 "+" at 4236.92,3497.66 h59.06
R90: Mechanical 15 "+" at 4440.24,3697.22 h59.06 r180
R91: Mechanical 15 "+" at 231.67,3257.59 h59.06 r90
R92: Mechanical 15 "+" at 300.57,3257.59 h59.06 r90
R93: Mechanical 15 "+" at 369.46,3258.57 h59.06 r90
R94: Mechanical 15 "+" at 1137.09,2893.09 h59.06 r180
R95: Mechanical 15 "+" at 1097.16,2901.2 h59.06
R96: Mechanical 15 "+" at 1958.29,2315.24 h59.06 r270
R97: Mechanical 15 "+" at 5181.8,434.67 h59.06
R98: Mechanical 15 "+" at 2095.1,2313.28 h59.06 r270
R99: Mechanical 15 "+" at 2250.61,2310.32 h59.06 r270
R100: Mechanical 15 "+" at 2398.25,2308.35 h59.06 r270
R101: Mechanical 15 "+" at 5168.68,4050.9 h59.06 r90
R102: Mechanical 15 "+" at 4932.7,2940.24 h59.06 r270
R103: Mechanical 15 "+" at 5533.18,4378.57 h59.06
R104: Mechanical 15 "+" at 5575.09,4367.5 h59.06 r180
R105: Mechanical 15 "+" at 5098.8,4459.36 h59.06 r90
R106: Mechanical 15 "+" at 5109.87,4500.28 h59.06 r270
R107: Mechanical 15 "+" at 2387.99,1207.44 h59.06 r135
R108: Mechanical 15 "+" at 2243.39,1286.9 h59.06 r225
R109: Mechanical 15 "+" at 2194.17,1337.1 h59.06 r225
R110: Mechanical 15 "+" at 2095.75,1434.54 h59.06 r225
R111: Mechanical 15 "+" at 2144.96,1384.34 h59.06 r225
R112: Mechanical 15 "+" at 1478.58,1350.2 h59.06 r315
R113: Mechanical 15 "+" at 1584.03,187.29 h59.06 r90
R114: Mechanical 15 "+" at 2005.29,184.34 h59.06 r90
R115: Mechanical 15 "+" at 2203.04,350.02 h59.06
R116: Mechanical 15 "+" at 2608.55,65.57 h59.06
R117: Mechanical 15 "+" at 1496.3,1173.67 h59.06 r225
R118: Mechanical 15 "+" at 1467.03,1542.13 h59.06 r45
R119: Mechanical 15 "+" at 1892.91,1652.06 h59.06 r45
R120: Mechanical 15 "+" at 2027.75,1500.49 h59.06 r45
R121: Mechanical 15 "+" at 3405.38,1349.24 h59.06 r225
R122: Mechanical 15 "+" at 3304.95,1351.16 h59.06 r225
R123: Mechanical 15 "+" at 3256.76,1400.42 h59.06 r225
R124: Mechanical 15 "+" at 3158.37,1500.85 h59.06 r225
R125: Mechanical 15 "+" at 3207.55,1449.63 h59.06 r225
R126: Mechanical 15 "+" at 2483.14,1407.65 h59.06 r315
R127: Mechanical 15 "+" at 1184.76,890.38 h59.06
R128: Mechanical 15 "+" at 2551.05,1230.14 h59.06 r225
R129: Mechanical 15 "+" at 2546.39,1643.87 h59.06 r45
R130: Mechanical 15 "+" at 1091.91,183.35 h59.06 r90
R131: Mechanical 15 "+" at 558.35,171.87 h59.06
R132: Mechanical 15 "+" at 2696,1681.91 h59.06 r135
R133: Mechanical 15 "+" at 3141.56,1506.76 h59.06 r45
U3: Mechanical 15 "+" at 5178.49,944.3 h59.06 r90
U4: Mechanical 15 "+" at 1774.51,3887.36 h59.06 r90; F.SilkS "Raspberry Pi Compute Module 4" at 2355.59,3338.58 h39.37 r90; F.Fab "HDMI0" at 1336.41,3198.66 h27.56; F.Fab "1V8" at 1302.94,4529.36 h27.56; F.Fab "USB" at 1907.61,3241.96 h27.56; F.Fab "GPIO" at 1720.26,4556.92 h27.56; F.Fab "CAM0" at 1714.03,3198.66 h27.56; F.Fab "DSI0" at 1471.25,3241.96 h27.56; F.Fab "ETH" at 1931.89,4556.92 h27.56; F.Fab "SD" at 1469.6,4552.99 h27.56; F.Fab "DS1" at 1231.1,3218.34 h27.56; F.Fab "CAM1" at 1715.35,3241.96 h27.56; F.Fab "HDMI1" at 1510.29,3194.72 h27.56; F.Fab "TV" at 1853.14,3238.03 h27.56; F.Fab "PCIe" at 1864.95,3198.66 h27.56; F.Fab "5V" at 1355.09,4576.61 h27.56; F.Fab "3V3" at 1405.3,4529.36 h27.56; Mechanical 16 "Wireless / Cutout" at 843.28,3847.01 h35.43 r90
U9: Mechanical 15 "+" at 4320.05,1990.48 h59.06 r45
U12: Mechanical 15 "+" at 3232.07,3172.38 h59.06 r90
U17: Mechanical 15 "+" at 4081.73,3282.68 h59.06 r90